# Altium PCB 4Bit_CPU_PCB_TEAM_C4.PcbDoc
Units mil, origin at the board's own origin, x right, y up, seen from the top; angles counter-clockwise.
Board outline 6000 x 4000 mil, 2 copper layers (Top Layer, Bottom Layer); 77 components, 63 nets, 450 pads, 42 vias.
Unrouted connection lines stored in the file: 53.
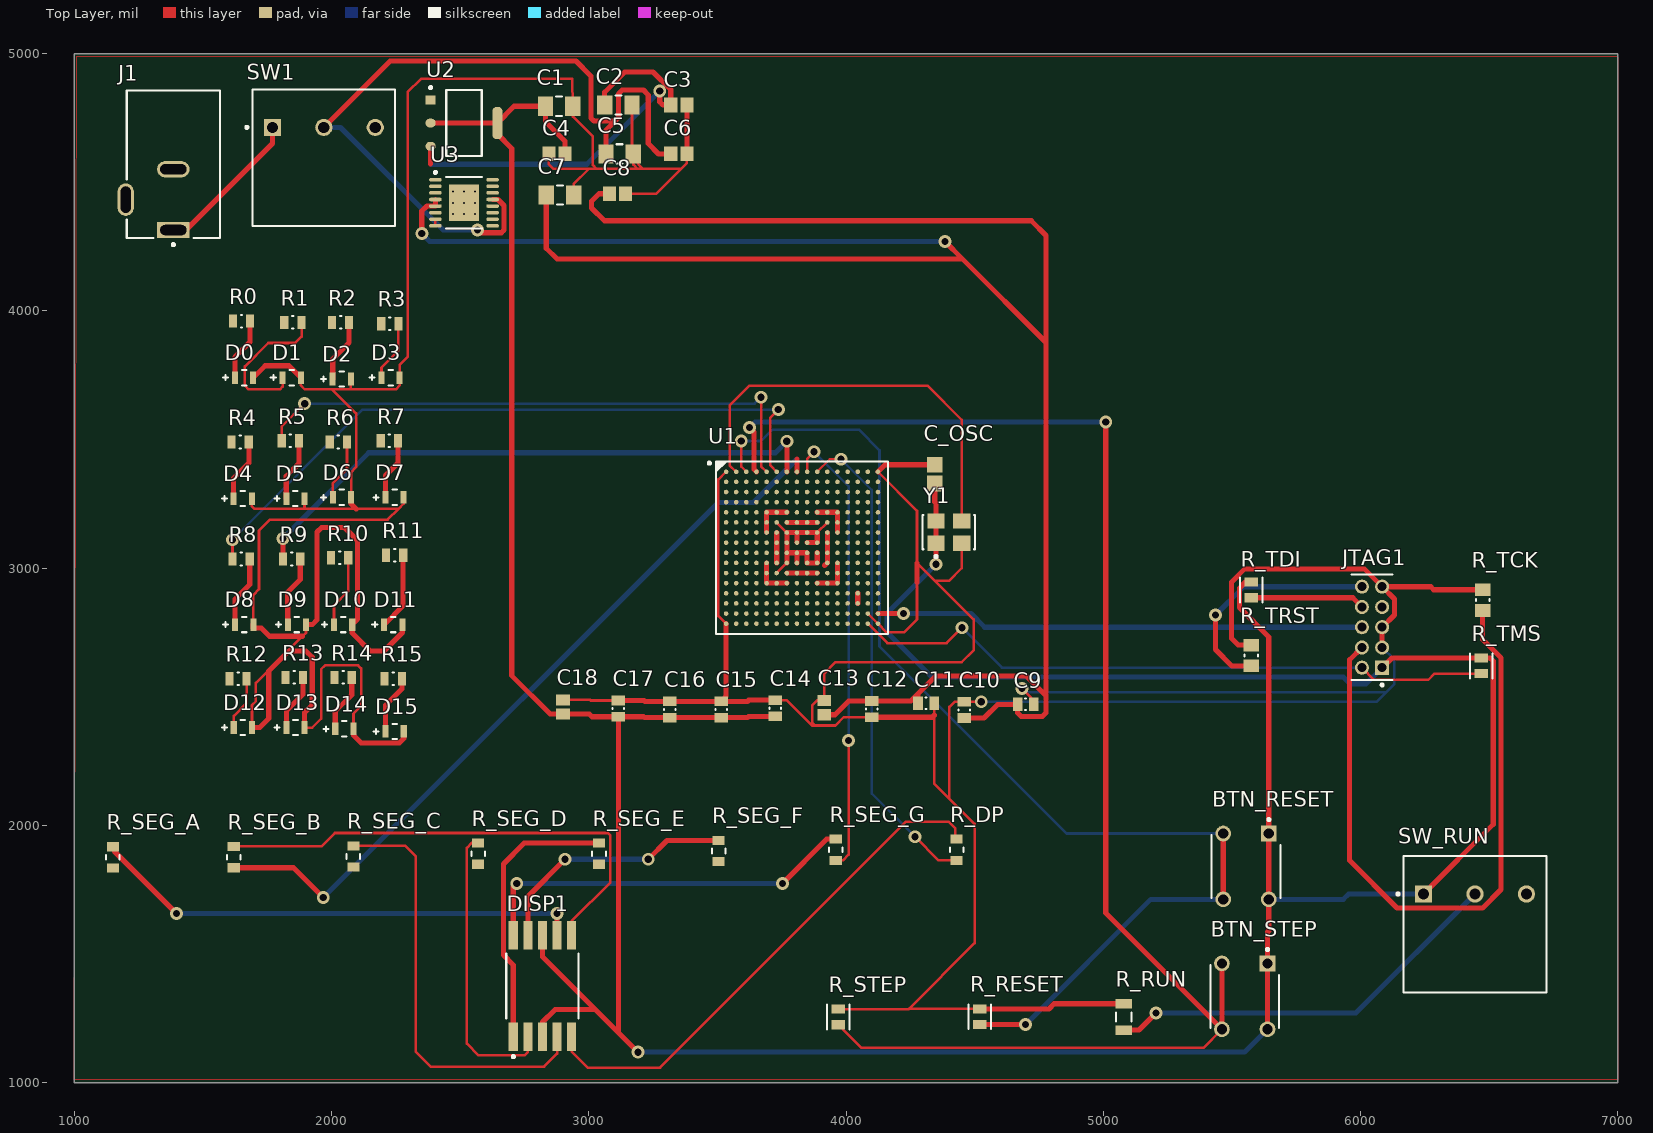
[diagram p0: Top Layer view]
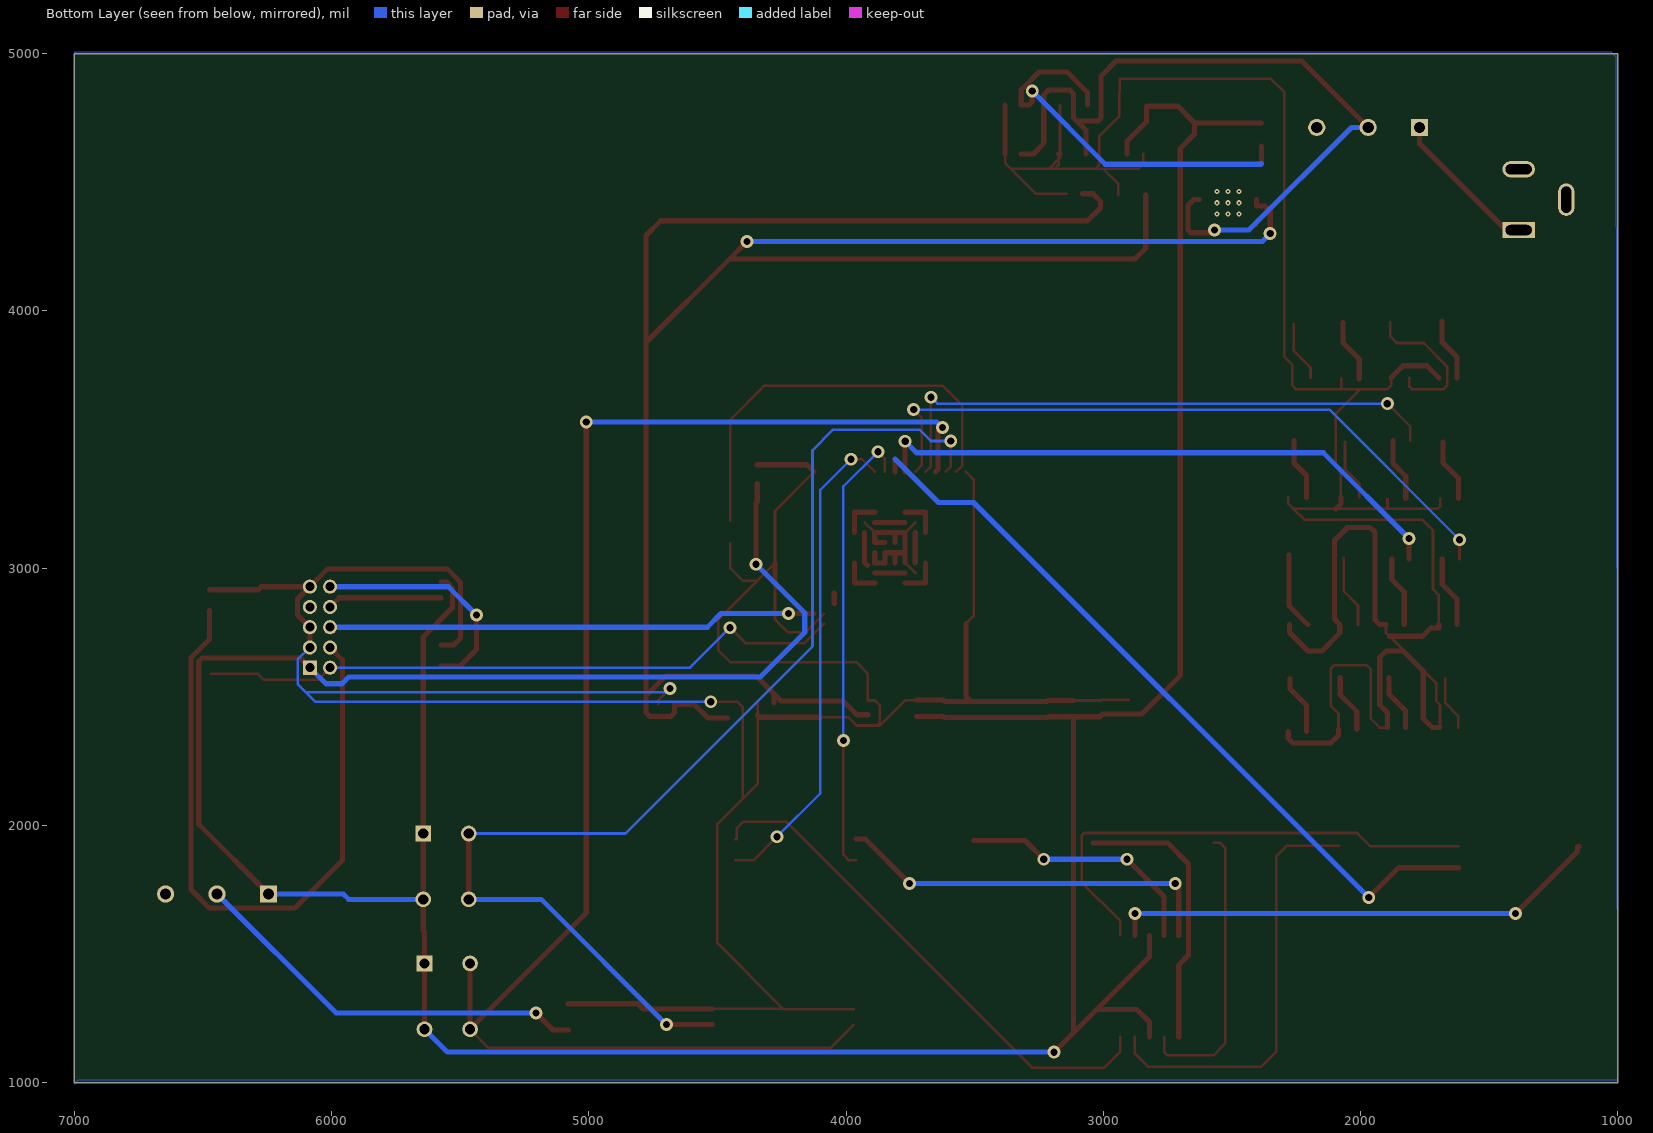
[diagram p1: Bottom Layer view, seen from below]

## Layer stack, top to bottom
Top Solder: solder mask 0.4, Solder Resist, Dk 3.5
Top Layer: signal copper 1.4
Dielectric 1: dielectric 12.6, FR-4, Dk 4.8
Bottom Layer: signal copper 1.4
Bottom Solder: solder mask 0.4, Solder Resist, Dk 3.5

## Board outline
1000,1000 7000,1000 7000,5000 1000,5000

## Design rules (kind name [scope] priority, off if disabled: settings)
Clearance [All] p1: gap=10 ignorepadtopadclearanceinfootprint=FALSE
PolygonConnect [All] p1: connectstyle=Relief reliefconductorwidth=10 reliefentries=4 polygonreliefangle="90 Angle" airgapwidth=10
RoutingVias [All] p1: holewidth=28 width=50 viastyle="Through Hole" minholewidth=28 minwidth=50 maxholewidth=28 maxwidth=50
SolderMaskExpansion [All] p1: expansion=0 istentingtop=FALSE
SupplyNets "Schematic Supply Nets_4" [InNet('+3V3')] p1: voltage=0.000
SupplyNets "Schematic Supply Nets_3" [InNet('GND')] p2: voltage=0.000
SupplyNets "Schematic Supply Nets_2" [InNet('+5V_IN')] p3: voltage=0.000
SupplyNets "Schematic Supply Nets_1" [InNet('+5V_SW')] p4: voltage=0.000
SupplyNets "Schematic Supply Nets" [InNet('+1V5')] p5: voltage=0.000
Width Power_Width [InNet('+5V_IN') OR InNet('+5V_SW') OR InNet('+3V3') OR InNet('+1V5')] p1: maxlimit=40 minlimit=12 preferedwidth=20
Width [All] p2: maxlimit=20 minlimit=8 preferedwidth=10
30 further rules are at their usual default settings.

## Components (designator, comment, footprint, x,y, rotation, side; value= is the part's Value field where it differs from the comment)
BTN_RESET "B3W-1000" FP-B3W-1000-MFG 5555,1840 r90 top
BTN_STEP "B3W-1000" FP-B3W-1000-MFG 5550,1335 r90 top
C1 "10uF" FP-1206-L_3_2_0_3-W_1_6_0-IPC_B 2885,4795 r0 top
C2 "10uF" FP-1206-L_3_2_0_3-W_1_6_0-IPC_B 3115,4800 r0 top
C3 "100nF" CAPC2013X145X50NL20T25 3350,4800 r0 top
C4 "100nF" CAPC2013X145X50NL20T25 2876.5,4610 r0 top
C5 "10uF" FP-1206-L_3_2_0_3-W_1_6_0-IPC_B 3120,4610 r0 top
C6 "100nF" CAPC2013X145X50NL20T25 3350,4610 r0 top
C7 "10uF" FP-1206-L_3_2_0_3-W_1_6_0-IPC_B 2888.17,4450 r0 top
C8 "100nF" CAPC2013X145X50NL20T25 3111.5,4455 r0 top
C9 "100nF" CAPC0805(2012)100_L 4698.5,2470 r0 top
C10 "100nF" CAPC0805(2012)100_L 4460,2448.5 r90 top
C11 "100nF" CAPC0805(2012)100_L 4311.5,2475 r0 top
C12 "100nF" CAPC0805(2012)100_L 4100,2451.5 r90 top
C13 "10uF" CAPC2013X140X50LL20T25 3915,2457.44 r90 top
C14 "100nF" CAPC0805(2012)100_L 3725,2455 r90 top
C15 "100nF" CAPC0805(2012)100_L 3515,2450 r90 top
C16 "100nF" CAPC0805(2012)100_L 3315,2450 r90 top
C17 "100nF" CAPC0805(2012)100_L 3115,2453.5 r90 top
C18 "10uF" CAPC2013X140X50LL20T25 2900,2460 r90 top
C_OSC "10nF" CAPC2013X94X50ML20T25 4345,3365 r90 top
D0 "SML-LX0805SRC-TR" FP-SML-LX0805SRC-TR-MFG 1660,3740 r0 top
D1 "SML-LX0805SRC-TR" FP-SML-LX0805SRC-TR-MFG 1845.43,3740 r0 top
D2 "SML-LX0805SRC-TR" FP-SML-LX0805SRC-TR-MFG 2040,3735 r0 top
D3 "SML-LX0805SRC-TR" FP-SML-LX0805SRC-TR-MFG 2229.57,3740 r0 top
D4 "SML-LX0805SRC-TR" FP-SML-LX0805SRC-TR-MFG 1655,3270 r0 top
D5 "SML-LX0805SRC-TR" FP-SML-LX0805SRC-TR-MFG 1859.57,3270 r0 top
D6 "SML-LX0805SRC-TR" FP-SML-LX0805SRC-TR-MFG 2040.43,3275 r0 top
D7 "SML-LX0805SRC-TR" FP-SML-LX0805SRC-TR-MFG 2245,3275 r0 top
D8 "SML-LX0805SRC-TR" FP-SML-LX0805SRC-TR-MFG 1660.43,2780 r0 top
D9 "SML-LX0805SRC-TR" FP-SML-LX0805SRC-TR-MFG 1865.43,2780 r0 top
D10 "SML-LX0805SRC-TR" FP-SML-LX0805SRC-TR-MFG 2045,2780 r0 top
D11 "SML-LX0805SRC-TR" FP-SML-LX0805SRC-TR-MFG 2240,2780 r0 top
D12 "SML-LX0805SRC-TR" FP-SML-LX0805SRC-TR-MFG 1655.43,2380 r0 top
D13 "SML-LX0805SRC-TR" FP-SML-LX0805SRC-TR-MFG 1860,2380 r0 top
D14 "SML-LX0805SRC-TR" FP-SML-LX0805SRC-TR-MFG 2050,2375 r0 top
D15 "SML-LX0805SRC-TR" FP-SML-LX0805SRC-TR-MFG 2245.43,2365 r0 top
DISP1 "ACSA02-41SURKWA-F01" FP-ACSA02-41SURKWA-F01-MFG 2820,1375 r0 top
J1 "DC Jack 5V Input" FP-PJ-102A-MFG 1385,4570 r0 top
JTAG1 "TMM-105-02-L-D" FP-TMM-105-02-L-D-MFG 6045,2770 r90 top
R0 "330R" FP-CRCW0805-e3-IPC_C 1650,3960 r0 top
R1 "330R" FP-CRCW0805-e3-IPC_C 1850,3955 r0 top
R2 "330R" FP-CRCW0805-e3-IPC_C 2035,3955 r0 top
R3 "330R" FP-CRCW0805-e3-IPC_C 2226.5,3950 r0 top
R4 "330R" FP-CRCW0805-e3-IPC_C 1645,3490 r0 top
R5 "330R" FP-CRCW0805-e3-IPC_C 1840,3495 r0 top
R6 "330R" FP-CRCW0805-e3-IPC_C 2026.5,3490 r0 top
R7 "330R" FP-CRCW0805-e3-IPC_C 2225,3495 r0 top
R8 "330R" FP-CRCW0805-e3-IPC_C 1648.5,3035 r0 top
R9 "330R" FP-CRCW0805-e3-IPC_C 1845,3035 r0 top
R10 "330R" FP-CRCW0805-e3-IPC_C 2031.5,3040 r0 top
R11 "330R" FP-CRCW0805-e3-IPC_C 2245,3050 r0 top
R12 "330R" FP-CRCW0805-e3-IPC_C 1636.5,2570 r0 top
R13 "330R" FP-CRCW0805-e3-IPC_C 1855,2575 r0 top
R14 "330R" FP-CRCW0805-e3-IPC_C 2045,2575 r0 top
R15 "330R" FP-CRCW0805-e3-IPC_C 2240,2570 r0 top
R_DP "330R" FP-RT0805-MFG 4430,1905 r90 top value=330Ω
R_RESET "10k" FP-CRGP0805-IPC_C 4520,1255.55 r90 top value=10KΩ
R_RUN "10k" FP-CRGCQ1206-IPC_C 5080,1255 r90 top value=10KΩ
R_SEG_A "330R" FP-RT0805-MFG 1150,1875 r90 top value=330Ω
R_SEG_B "330R" FP-RT0805-MFG 1620,1876.34 r90 top value=330Ω
R_SEG_C "330R" FP-RT0805-MFG 2085,1878.66 r90 top value=330Ω
R_SEG_D "330R" FP-RT0805-MFG 2570,1890 r90 top value=330Ω
R_SEG_E "330R" FP-RT0805-MFG 3040,1890 r90 top value=330Ω
R_SEG_F "330R" FP-RT0805-MFG 3505,1900 r90 top value=330Ω
R_SEG_G "330R" FP-RT0805-MFG 3960,1905 r90 top value=330Ω
R_STEP "10k" FP-CRGP0805-IPC_C 3970,1255 r90 top value=10KΩ
R_TCK "1k" RESC2013X50X30ML20T20 6475,2875.35 r90 top
R_TDI "10k" FP-CRGP0805-IPC_C 5575,2915 r90 top value=10KΩ
R_TMS "10k" FP-CRGP0805-IPC_C 6470,2620 r90 top value=10KΩ
R_TRST "1k" RESC2013X50X30ML20T20 5575,2660 r90 top
SW1 "25536NA6" FP-25536NA6-0 1970,4595 r0 top
SW_RUN "25536NA6" FP-25536NA6-0 6445,1615 r0 top
U1 "M7A3P600-FG256" FG256 3829.06,3079.06 r0 top
U2 "AMS1117-3.3" FP-AMS1117-IPC_C 2515,4730 r0 top
U3 "1.5V Regulator" LT-FE-16-EPV-BB_L 2515,4420 r0 top
Y1 "ASFL1-100.000MHZ-L-T" FP-ASFL1-MFG 4400,3140 r0 top

## Footprints (in the part's own frame and the unit in brackets; to place one, negate y for a bottom-side part, rotate by r counter-clockwise, add the part's x,y. Pads: shape width x height; smd on the part's side, far side on the other; paste and mask are expansions set on the pad)
CAPC0805(2012)100_L [mm] "Chip Capacitor, Body 2.0x1.2mm, Height 1.0mm, IPC High Density"
  rect 0.95x1.35 smd: 1(-0.8,0) 2(0.8,0)
  silkscreen extent -0.05,-0.58 0.05,0.58, body extent -1.1,-0.72 1.1,0.72, height 1
CAPC2013X94X50ML20T25 [mm] "Chip Capacitor, 2-Leads, Body 2.01x1.25mm, IPC Low Density"
  rect 1.55x1.55 smd: 1(-0.925,0) 2(0.925,0)
  body extent -1.1,-0.72 1.11,0.72, height 0.94
CAPC2013X140X50LL20T25 [mm] "Chip Capacitor, 2-Leads, Body 2.00x1.25mm, IPC High Density"
  rect 1.1x1.35 smd: 1(-0.7,0) 2(0.7,0)
  body extent -1.1,-0.72 1.1,0.72, height 1.4
CAPC2013X145X50NL20T25 [mm] "Chip Capacitor, 2-Leads, Body 2.00x1.25mm, IPC Medium Density"
  rect 1.3x1.45 smd: 1(-0.8,0) 2(0.8,0)
  body extent -1.1,-0.72 1.1,0.72, height 1.45
FG256 [mm] "BGA, 256-Leads, Body 17x17mm, Pitch 1mm"
  round 0.45 smd: A1(-7.5,7.5) A2(-6.5,7.5) A3(-5.5,7.5) A4(-4.5,7.5) A5(-3.5,7.5) A6(-2.5,7.5) A7(-1.5,7.5) A8(-0.5,7.5) A9(0.5,7.5) A10(1.5,7.5) A11(2.5,7.5) A12(3.5,7.5) A13(4.5,7.5) A14(5.5,7.5) A15(6.5,7.5) A16(7.5,7.5) B1(-7.5,6.5) B2(-6.5,6.5) B3(-5.5,6.5) B4(-4.5,6.5) B5(-3.5,6.5) B6(-2.5,6.5) B7(-1.5,6.5) B8(-0.5,6.5) B9(0.5,6.5) B10(1.5,6.5) B11(2.5,6.5) B12(3.5,6.5) B13(4.5,6.5) B14(5.5,6.5) B15(6.5,6.5) B16(7.5,6.5) C1(-7.5,5.5) C2(-6.5,5.5) C3(-5.5,5.5) C4(-4.5,5.5) C5(-3.5,5.5) C6(-2.5,5.5) C7(-1.5,5.5) C8(-0.5,5.5) C9(0.5,5.5) C10(1.5,5.5) C11(2.5,5.5) C12(3.5,5.5) C13(4.5,5.5) C14(5.5,5.5) C15(6.5,5.5) C16(7.5,5.5) D1(-7.5,4.5) D2(-6.5,4.5) D3(-5.5,4.5) D4(-4.5,4.5) D5(-3.5,4.5) D6(-2.5,4.5) D7(-1.5,4.5) D8(-0.5,4.5) D9(0.5,4.5) D10(1.5,4.5) D11(2.5,4.5) D12(3.5,4.5) D13(4.5,4.5) D14(5.5,4.5) D15(6.5,4.5) D16(7.5,4.5) E1(-7.5,3.5) E2(-6.5,3.5) E3(-5.5,3.5) E4(-4.5,3.5) E5(-3.5,3.5) E6(-2.5,3.5) E7(-1.5,3.5) E8(-0.5,3.5) E9(0.5,3.5) E10(1.5,3.5) E11(2.5,3.5) E12(3.5,3.5) E13(4.5,3.5) E14(5.5,3.5) E15(6.5,3.5) E16(7.5,3.5) F1(-7.5,2.5) F2(-6.5,2.5) F3(-5.5,2.5) F4(-4.5,2.5) F5(-3.5,2.5) F6(-2.5,2.5) F7(-1.5,2.5) F8(-0.5,2.5) F9(0.5,2.5) F10(1.5,2.5) F11(2.5,2.5) F12(3.5,2.5) F13(4.5,2.5) F14(5.5,2.5) F15(6.5,2.5) F16(7.5,2.5) G1(-7.5,1.5) G2(-6.5,1.5) G3(-5.5,1.5) G4(-4.5,1.5) G5(-3.5,1.5) G6(-2.5,1.5) G7(-1.5,1.5) G8(-0.5,1.5) G9(0.5,1.5) G10(1.5,1.5) G11(2.5,1.5) G12(3.5,1.5) G13(4.5,1.5) G14(5.5,1.5) G15(6.5,1.5) G16(7.5,1.5) H1(-7.5,0.5) H2(-6.5,0.5) H3(-5.5,0.5) H4(-4.5,0.5) H5(-3.5,0.5) H6(-2.5,0.5) H7(-1.5,0.5) H8(-0.5,0.5) H9(0.5,0.5) H10(1.5,0.5) H11(2.5,0.5) H12(3.5,0.5) H13(4.5,0.5) H14(5.5,0.5) H15(6.5,0.5) H16(7.5,0.5) J1(-7.5,-0.5) J2(-6.5,-0.5) J3(-5.5,-0.5) J4(-4.5,-0.5) J5(-3.5,-0.5) J6(-2.5,-0.5) J7(-1.5,-0.5) J8(-0.5,-0.5) J9(0.5,-0.5) J10(1.5,-0.5) J11(2.5,-0.5) J12(3.5,-0.5) J13(4.5,-0.5) J14(5.5,-0.5) J15(6.5,-0.5) J16(7.5,-0.5) K1(-7.5,-1.5) K2(-6.5,-1.5) K3(-5.5,-1.5) K4(-4.5,-1.5) K5(-3.5,-1.5) K6(-2.5,-1.5) K7(-1.5,-1.5) K8(-0.5,-1.5) K9(0.5,-1.5) K10(1.5,-1.5) K11(2.5,-1.5) K12(3.5,-1.5) K13(4.5,-1.5) K14(5.5,-1.5) K15(6.5,-1.5) K16(7.5,-1.5) L1(-7.5,-2.5) L2(-6.5,-2.5) L3(-5.5,-2.5) L4(-4.5,-2.5) L5(-3.5,-2.5) L6(-2.5,-2.5) L7(-1.5,-2.5) L8(-0.5,-2.5) L9(0.5,-2.5) L10(1.5,-2.5) L11(2.5,-2.5) L12(3.5,-2.5) L13(4.5,-2.5) L14(5.5,-2.5) L15(6.5,-2.5) L16(7.5,-2.5) M1(-7.5,-3.5) M2(-6.5,-3.5) M3(-5.5,-3.5) M4(-4.5,-3.5) M5(-3.5,-3.5) M6(-2.5,-3.5) M7(-1.5,-3.5) M8(-0.5,-3.5) M9(0.5,-3.5) M10(1.5,-3.5) M11(2.5,-3.5) M12(3.5,-3.5) M13(4.5,-3.5) M14(5.5,-3.5) M15(6.5,-3.5) M16(7.5,-3.5) N1(-7.5,-4.5) N2(-6.5,-4.5) N3(-5.5,-4.5) N4(-4.5,-4.5) N5(-3.5,-4.5) N6(-2.5,-4.5) N7(-1.5,-4.5) N8(-0.5,-4.5) N9(0.5,-4.5) N10(1.5,-4.5) N11(2.5,-4.5) N12(3.5,-4.5) N13(4.5,-4.5) N14(5.5,-4.5) N15(6.5,-4.5) N16(7.5,-4.5) P1(-7.5,-5.5) P2(-6.5,-5.5) P3(-5.5,-5.5) P4(-4.5,-5.5) P5(-3.5,-5.5) P6(-2.5,-5.5) P7(-1.5,-5.5) P8(-0.5,-5.5) P9(0.5,-5.5) P10(1.5,-5.5) P11(2.5,-5.5) P12(3.5,-5.5) P13(4.5,-5.5) P14(5.5,-5.5) P15(6.5,-5.5) P16(7.5,-5.5) R1(-7.5,-6.5) R2(-6.5,-6.5) R3(-5.5,-6.5) R4(-4.5,-6.5) R5(-3.5,-6.5) R6(-2.5,-6.5) R7(-1.5,-6.5) R8(-0.5,-6.5) R9(0.5,-6.5) R10(1.5,-6.5) R11(2.5,-6.5) R12(3.5,-6.5) R13(4.5,-6.5) R14(5.5,-6.5) R15(6.5,-6.5) R16(7.5,-6.5) T1(-7.5,-7.5) T2(-6.5,-7.5) T3(-5.5,-7.5) T4(-4.5,-7.5) T5(-3.5,-7.5) T6(-2.5,-7.5) T7(-1.5,-7.5) T8(-0.5,-7.5) T9(0.5,-7.5) T10(1.5,-7.5) T11(2.5,-7.5) T12(3.5,-7.5) T13(4.5,-7.5) T14(5.5,-7.5) T15(6.5,-7.5) T16(7.5,-7.5)
  silkscreen extent -9.27,-8.5 8.5,8.5, body extent -8.5,-8.5 8.5,8.5, height 1.97
FP-1206-L_3_2_0_3-W_1_6_0-IPC_B [mil]
  rect 59.18x74.97 smd paste+0 mask+0: 1(-53.17,0) 2(53.17,0)
  silkscreen extent -12,-37 12,37, body extent -93,-47 93,47, height 10
FP-25536NA6-0 [mm]
  rect 1.7x1.7 hole 1.1 paste-2539.97 mask+0: 1(-5.08,3)
  round 1.7 hole 1.1 paste-2539.97 mask+0: 2(0,3) 3(5.08,3)
  silkscreen extent -7.72,-6.75 7.05,6.75, body extent -7.15,-6.85 7.15,6.85, height 0.25
FP-ACSA02-41SURKWA-F01-MFG [mm]
  rect 0.9x2.8 smd paste+0 mask+0: 1(-2.88,-5) 2(-1.44,-5) 3(0,-5) 4(1.44,-5) 5(2.88,-5) 6(2.88,5) 7(1.44,5) 8(0,5) 9(-1.44,5) 10(-2.88,5)
  silkscreen extent -3.57,-7.1 3.57,3.22, body extent -3.67,-6.5 3.67,6.5, height 0.25
FP-AMS1117-IPC_C [mm]
  rect 1.004x0.872 smd paste+0 mask+0: 1(-3.295,2.29)
  rrect100% 1.004x0.872 smd paste+0 mask+0: 2(-3.295,0) 3(-3.295,-2.29)
  rrect87% 1.004x3.182 smd paste+0 mask+0: 4(3.295,0)
  silkscreen extent -3.42,-3.25 1.75,3.62, body extent -3.9,-3.35 3.9,3.35, height 0.25
FP-ASFL1-MFG [mm]
  rect 1.7x1.5 smd paste+0 mask+0: 1(-1.27,-1.1) 2(1.27,-1.1) 3(1.27,1.1) 4(-1.27,1.1)
  silkscreen extent -2.6,-2.54 2.6,1.7, body extent -2.7,-1.95 2.7,1.95, height 0.25
FP-B3W-1000-MFG [mm]
  rect 1.55x1.55 hole 1 paste-2539.97 mask+0: 1(3.25,-2.25)
  round 1.55 hole 1 paste-2539.97 mask+0: 2(-3.25,-2.25) 3(3.25,2.25) 4(-3.25,2.25)
  silkscreen extent -3.1,-3.4 4.75,3.4, body extent -4.13,-3.5 4.13,3.5, height 0.25
FP-CRCW0805-e3-IPC_C [mil]
  rect 31.75x51.5 smd paste+0 mask+0: 1(-33.5,0) 2(33.5,0)
  silkscreen extent -3,-25 3,25, body extent -53,-31 53,31, height 10
FP-CRGCQ1206-IPC_C [mil]
  rect 37.64x63.38 smd paste+0 mask+0: 1(-51.22,0) 2(51.22,0)
  silkscreen extent -18,-31 18,31, body extent -74,-37 74,37, height 10
FP-CRGP0805-IPC_C [mil]
  rect 35.67x51.57 smd paste+0 mask+0: 1(-30.55,0) 2(30.55,0)
  silkscreen extent -48,-43 48,43, body extent -52,-31 52,31, height 10
FP-PJ-102A-MFG [mm]
  rect 3.2x1.6 hole 1 slot 2.6 at 0 deg paste-2539.97 mask+0: 1(0,-6.5)
  rrect100% 3.2x1.6 hole 1 slot 2.6 at 0 deg paste-2539.97 mask+0: 2(0,-0.5)
  rrect100% 1.6x3.2 hole 2.6 slot 1 at 0 deg paste-2539.97 mask+0: 3(-4.7,-3.5)
  silkscreen extent -4.6,-8.07 4.6,7.3, body extent -5.6,-7.4 4.7,7.4, height 0.25
FP-RT0805-MFG [mm]
  rect 0.9x1.2 smd paste+0 mask+0: 1(-1.05,0) 2(1.05,0)
  silkscreen extent -0.22,-0.67 0.22,0.67, body extent -1.6,-0.77 1.6,0.77, height 0.25
FP-SML-LX0805SRC-TR-MFG [mm]
  rect 0.6x1.25 smd paste+0 mask+0: 1(-0.9,0) 2(0.9,0)
  silkscreen extent -2.07,-0.75 0.22,0.75, body extent -1.3,-0.85 1.3,0.85, height 0.25
FP-TMM-105-02-L-D-MFG [mm]
  rect 1.39x1.39 hole 0.89 paste-2539.97 mask+0: 1(-4,-1)
  round 1.39 hole 0.89 paste-2539.97 mask+0: 2(-4,1) 3(-2,-1) 4(-2,1) 5(0,-1) 6(0,1) 7(2,-1) 8(2,1) 9(4,-1) 10(4,1)
  silkscreen extent -5.82,-2.03 5.22,2.03
LT-FE-16-EPV-BB_L [mm] "SOP, 16-Leads, Body 5.1x4.5mm, Pitch 0.65mm, Thermal Pad 3.58x2.94mm, IPC High Density"
  oval 1.25x0.35 smd: 1(-2.825,2.275) 2(-2.825,1.625) 3(-2.825,0.975) 4(-2.825,0.325) 5(-2.825,-0.325) 6(-2.825,-0.975) 7(-2.825,-1.625) 8(-2.825,-2.275) 9(2.825,-2.275) 10(2.825,-1.625) 11(2.825,-0.975) 12(2.825,-0.325) 13(2.825,0.325) 14(2.825,0.975) 15(2.825,1.625) 16(2.825,2.275)
  rect 2.94x3.58 smd: 17(0,0)
  silkscreen extent -2.95,-2.55 1.8,3.12, body extent -2.25,-2.55 2.25,2.55, height 1.1
RESC2013X50X30ML20T20 [mm] "Chip Resistor, 2-Leads, Body 2.00x1.25mm, IPC Low Density"
  rect 1.25x1.55 smd: 1(-1.025,0) 2(1.025,0)
  silkscreen extent -0.1,-0.67 0.1,0.67, body extent -1.1,-0.72 1.1,0.72, height 0.5

## Part data
BTN_RESET BTN_STEP: library part CMP-08834-000045-1, "SWITCH TACTILE SPST-NO 0.05A 24V", Actuator Color=White, Contact Current Rating=50mA, Contact Resistance=100mR, Insulation Resistance=100MR, Max Operating Temperature=70°C, Max Voltage Rating (DC)=24V, Min Operating Temperature=-25°C, Operating Force=1.57N, Package Quantity=100, Ratings=IP67, Actuator Length=0.9mm, Actuator Type=Standard, Contact Material=Silver, Contact Plating=Silver, Current Rating=50mA, Depth=6.6mm, Illumination Type=Non-Illuminated, Length=6.6mm, Max Current Rating=50mA, Mechanical Life=1000000Cycles, Mount="Through Hole", Number of Poles=1, Orientation=Straight, Packaging=Bulk, Radiation Hardening=No, RoHS Compliant=Yes, Series=B3W, Switch Function=Off-Mom, Switch Travel=0.25mm, Termination="PC Pins", Throw Configuration=SPST, Voltage Rating (DC)=24V, Weight=0.3g
C1 C2 C5 C7: library part CMP-2000-07359-3, "None", Case Code (Imperial)=1206, Case Code (Metric)=3216, Dielectric=X5R, Max Operating Temperature=85°C, Min Operating Temperature=-55°C, Package Quantity=2000, Tolerance=20%, Voltage Rating=50V, Capacitance=10uF, Case/Package=1206, Construction=Flat, Halogen Free="Halogen Free", Height=1.6mm, Length=0.126inch, Mount="Surface Mount", Packaging="Tape and Reel", RoHS Compliant=Yes, Series=M, Termination=SMD/SMT, Thickness=0.075inch, Voltage Rating (DC)=50V, Width=0.063inch
C3 C4 C6 C8: library part CMP-2007-01227-1, Manufacturer=Kemet, Part Number=C0805S104K5RACTU
C9 C10 C11 C12 C14 C15 C16 C17: library part CMP-1036-04418-1, "CAP 100nF 50V ±5% 0805 (2012 Metric) Thickness 1mm SMD", Case-EIA=0805, Case-Metric=2012, Rated Voltage="50 V", Tolerance=Â±5%, Max Thickness="1 mm", Technology=SMT
C13 C18: library part CMP-1036-04929-2, Manufacturer="AVX Interconnect / Elco", Part Number=0805YD106MAT2A
C_OSC: library part CMP-2007-04168-1, Manufacturer="AVX Interconnect / Elco", Part Number=08051C103KAT4A
D0 D1 D2 D3 D4 D5 D6 D7 D8 D9 D10 D11 D12 D13 D14 D15: library part CMP-57192-000013-1, "LED RED CLEAR SMD", Case Code (Imperial)=0805, Case Code (Metric)=2012, Color=Red, Current Rating=25mA, Forward Current=20mA, Forward Voltage=1.7V, Lens Color=Colorless, Max Operating Temperature=85°C, Min Operating Temperature=-40°C, Package Quantity=3000, Power Rating=100mW, Approvals=UL, Case/Package=0805, Dominant Wavelength=660nm, Height=1.2mm, Illumination Color=Red, Lead Free="Lead Free", Length=2mm, Lens Style=Clear, Lens Transparency=Clear, Luminous Intensity=25mcd, Mount="Surface Mount", Number of LEDs=1, Number of Pins=2, Packaging="Tape and Reel", RoHS Compliant=Yes, Series=-, Test Current=20mA, Viewing Angle=140°, Voltage Rating=1.7V, Voltage Rating (DC)=1.7V, Wavelength=660nm, Width=1.25mm
DISP1: library part CMP-44525-000003-1, "DISPLAY 7-SEG 0.2\" SGL RED 10SMD", Case/Package=SMD/SMT, Color=Red, Forward Current=30mA, Forward Voltage=1.95V, Max Operating Temperature=85°C, Max Power Dissipation=75mW, Min Operating Temperature=-40°C, Package Quantity=650, Test Current=20mA, Element Configuration="Common Anode", Height=0.315inch, Illumination Color=Red, Luminous Intensity=30mcd, Number of Characters=1, Operating Supply Voltage=1.95V, Packaging="Tape and Reel", Power Consumption=75mW, Wavelength=630nm, Width=0.272inch
J1: library part CMP-12637-106234071-1, "PJ-102A 2.0 x 6.5 mm, 2.5 A, Horizontal, Through Hole, Tapered Pins, Dc Power Jack Connector", Color=Black, Current Rating=2.5A, Flammability Rating="UL94 V-0", Insulation Resistance=50MΩ, Max Operating Temperature=85°C, Min Operating Temperature=-25°C, Voltage Rating=24V, Contact Gender=Male, Contact Material="Copper, Nickel, Tin", Contact Plating=Nickel, Diameter=2.1mm, Gender=Male, Height=11.2mm, Housing Color=Black, Housing Material=Thermoplastic, Inside Diameter=2mm, Lead Free="Lead Free", Lifecycle Status=Production, Mount="Through Hole", NexarPartId=106234071, Number of Conductors=2, Number of Contacts=3, Orientation=Horizontal, Outside Diameter=6.5mm, Packaging=Bulk, RoHS=Compliant, Schedule B="8536695050, 8536695050", Shielding=No, Termination="Through Hole", Voltage Rating (DC)=24V
JTAG1: library part CMP-02766-001571-1, "CONN HEADER VERT 10POS 2MM", Housing Color=Black, Max Current Rating=3.9A, Max Operating Temperature=125°C, Max Voltage Rating (AC)=500V, Min Operating Temperature=-55°C, Connector Type=Header, Contact Finish - Mating=GOLD, Contact Material=Bronze, Contact Plating=Gold, Contact Shape=Square, Contact Type="Male Pin", Depth=3.94mm, Fastening Type=Pull, Gender=Male, Housing Material=Polymer, Insulation Color=Black, Insulation Material=Polymer, Lead Free="Lead Free", Length=10mm, Number of Contacts=10, Number of Positions=10, Number of Rows=2, Orientation=Straight, Packaging=Bulk, Pitch=2mm, Radiation Hardening=No, REACH SVHC="No SVHC", RoHS Compliant=Yes, Series=TMM, Termination=Solder
R0 R1 R2 R3 R4 R5 R6 R7 R8 R9 R10 R11 R12 R13 R14 R15: library part CMP-2001-03824-2, "RES Thick Film, 330Ω, 5%, 0.125W, 200ppm/°C, 0805", Case Code (Imperial)=0805, Case Code (Metric)=2012, Max Operating Temperature=155°C, Max Power Dissipation=125mW, Min Operating Temperature=-55°C, Package Quantity=1, Temperature Coefficient=200ppm/°C, Tolerance=5%, Voltage Rating=150V, Case/Package=0805, Composition="Thick Film", Contact Plating=Tin, Depth=1.25mm, Features="Automotive AEC-Q200", Height=0.02inch, Lead Free="Lead Free", Length=2mm, Military Standard=Not, Number of Terminations=2, Packaging="Tape and Reel", Power Rating=125mW, Radiation Hardening=No, Resistance=330R, Termination=SMD/SMT, Voltage Rating (DC)=150V, Weight=0.000194oz, Width=0.049inch
R_DP R_SEG_A R_SEG_B R_SEG_C R_SEG_D R_SEG_E R_SEG_F R_SEG_G: library part CMP-2001-01631-2, "RES 330 OHM 1/8W .1% SMD 0805", Manufacturer=Yageo, Manufacturer Part Number=RT0805BRD07330RL, Package=RT0805, Power Rating=0.125W, Resistance=330Ω, Temperature="-55°C to +155°C", Temperature Coefficient="25 ppm/°C", Temperature Range High=+155°C, Temperature Range Low=-55°C, Tolerance=0.0025, Voltage Rating=150V, Automotive=No, Category=Res, ComponentLink2Description=Datasheet, ComponentLink2URL=http://www.yageo.com/documents/recent/PYu-RT_1-to-0.01_RoHS_L_9.pdf, Composition="Thin Film", Device Class L1="Passive Components", Device Class L2=Resistors, Device Class L3="Chip SMD Resistors", Digikey Description="RES 330 OHM 1/8W .1% SMD 0805", Footprint Url=http://www.yageo.com/exep/pages/download/literatures/PYu-R_Mount_10.pdf, Height=0.6mm, Ipc Land Pattern Name=RESC200125X50, Lead Free=Yes, Mouser Description="Thin Film Resistors - SMD 1/8W 330 ohm .1% 25ppm", Octopart=https://octopart.com/rt0805brd07330rl-yageo-1374790, RoHS=TRUE, Series=RT
R_RESET R_TDI R_TMS: library part CMP-03211-006861-1, "CRGP 0805 10K 1%", Ambient Temperature Range High=+70°C, Manufacturer=TE, Manufacturer Part Number=CRGP0805F10K, Package=CRGP0805, Power Rating=0.33W, Resistance=10KΩ, Temperature="-55°C to +155°C", Temperature Coefficient=±100ppm/°C, Temperature Range High=+155°C, Temperature Range Low=-55°C, Tolerance=0.01, Voltage Rating=150V, Automotive=No, Category=Res, ComponentLink2Description=Datasheet, ComponentLink2URL=https://www.mouser.com/datasheet/2/418/NG_DS_9-1773463-9_A-1358566.pdf, Composition="Thick Film", Device Class L1="Passive Components", Device Class L2=Resistors, Device Class L3="Chip SMD Resistors", Digikey Description="CRGP 0805 10K 1%", Height=0.65mm, Ipc Land Pattern Name=RESC200125X55, Lead Free=Yes, Octopart=https://octopart.com/crgp0805f10k-te+connectivity-91018782, RoHS=TRUE, Series=CRGP
R_RUN: library part CMP-03211-010884-1, "CRGCQ1206 10KΩ 0.25W 1% ±100ppm/°C 200V", Ambient Temperature Range High=+70°C, Manufacturer="TE Connectivity", Manufacturer Part Number=CRGCQ1206F10K, Package=CRGCQ1206, Power Rating=0.25W, Resistance=10KΩ, Temperature="-55°C to +155°C", Temperature Coefficient=±100ppm/°C, Temperature Range High=+155°C, Temperature Range Low=-55°C, Tolerance=0.01, Voltage Rating=200V, Automotive=Yes, Automotive Grade="Grade 913", Category=Res, ComponentLink2Description=Datasheet, ComponentLink2URL=https://www.te.com/commerce/DocumentDelivery/DDEController?Action=showdoc&DocId=Data+Sheet%7F1773204-3%7F1%7Fpdf%7FEnglish%7FENG_DS_1773204-3_1.pdf%7F4-2176347-922, Composition="Thick Film", Device Class L1="Passive Components", Device Class L2=Resistors, Device Class L3="Chip SMD Resistors", Height=0.65mm, Ipc Land Pattern Name=RESC310155X55, Lead Free=Yes, Octopart=https://octopart.com/crgcq1206f10k-te+connectivity-91018244, RoHS=TRUE, Series=CRGCQ
R_STEP: library part CMP-03211-006861-1, Ambient Temperature Range High=+70°C, Manufacturer=TE, Manufacturer Part Number=CRGP0805F10K, Package=CRGP0805, Power Rating=0.33W, Resistance=10KΩ, Temperature="-55°C to +155°C", Temperature Coefficient=±100ppm/°C, Temperature Range High=+155°C, Temperature Range Low=-55°C, Tolerance=0.01, Voltage Rating=150V, Automotive=No, Category=Res, ComponentLink2Description=Datasheet, ComponentLink2URL=https://www.mouser.com/datasheet/2/418/NG_DS_9-1773463-9_A-1358566.pdf, Composition="Thick Film", Device Class L1="Passive Components", Device Class L2=Resistors, Device Class L3="Chip SMD Resistors", Digikey Description="CRGP 0805 10K 1%", Height=0.65mm, Ipc Land Pattern Name=RESC200125X55, Lead Free=Yes, Octopart=https://octopart.com/crgp0805f10k-te+connectivity-91018782, RoHS=TRUE, Series=CRGP
R_TCK R_TRST: library part CMP-2001-04268-1, Manufacturer="Vishay Dale", Part Number=CRCW08051K00FKTC
SW1 SW_RUN: library part CMP-47022-000007-1, "SWITCH SLIDE SPDT 4A 125V", Contact Current Rating=4A, Contact Resistance=10mR, Current Rating=1A, Max Operating Temperature=85°C, Max Voltage Rating (AC)=250V, Max Voltage Rating (DC)=30V, Min Operating Temperature=-40°C, Package Quantity=100, Voltage Rating (AC)=125V, Actuator Length=6mm, Actuator Material=Nylon, Actuator Type=Standard, Contact Material=Silver, Contact Plating=Silver, Electrical Life=10000Cycles, Illumination Type=Non-Illuminated, Mechanical Life=20000Cycles, Mount="Through Hole", Orientation="Right Angle", Packaging=Bulk, Series=25000N, Switch Function=On-On, Switch Travel=4mm, Termination="PC Pin", Throw Configuration=SPDT, Voltage Rating (DC)=30V
U1: library part CMP-0097-00122-1, "M7-Ready ProASIC3 Flash Family FPGA, 177 User IOs, 600K System Gates, 108 Kbits RAM, 1 Kbit Flash ROM, 1 PLL, 256-Ball FBGA, Commercial Grade", Code_JEDEC=MO-192-DAF-1, ComponentAvailability="F speed grade removed in ver1.3, Oct-2009 datasheet.", DatasheetVersion="v1.1, Feb-2009", PackageDescription="256-Ball Fine Pitch Plastic Ball Grid Array 1.00 mm Pitch (FG256)", PackageReference=FG256, PackageVersion="ver11.2, Nov-2009"
U2: library part CMP-209535-000001-1, "LDO Voltage Regulators 1A, 3.3V", Dropout Voltage=1.1V, Manufacturer="Advanced Monolithic Systems", Max Junction Temp=+125°C, Max Power Dissipation=1.2W, Max Supply Voltage=15V, Nominal Supply Current=5mA, Output Current=1A, Output Voltage=3.3V, Package=AMS1117, Temperature="-40°C to +125°C", Temperature Range Low=-40°C, Automotive=No, Category=IC, ComponentLink2Description=Datasheet, ComponentLink2URL=http://www.advanced-monolithic.com/pdf/ds1117.pdf, Device Class L1="Integrated Circuits (ICs)", Device Class L2="Power Management ICs", Device Class L3="Voltage Regulators - Linear", Height=1.8mm, Ipc Land Pattern Name=SOT229P700X180-4, Lead Free=Yes, Manufacturer Part Number=AMS1117-3.3, Number Of Outputs=1, Octopart=https://octopart.com/ams1117-3.3-advanced+monolithic+systems-25899300, Output Type=Fixed, RoHS=TRUE, Standoff Height=0.64mm, Temperature Range High=+125°C
U3: library part CMP-0476-00499-1, "3 A, Fast Transient Response, Low Noise, LDO Regulator, 2.7 to 20 V Vin, 1.5 V Vout, 16-pin SOP (FE-16-EPV-BB), -40 to 125 degC, Pb-Free, Tape and Reel", Dropout Voltage(V)=0.34, Manufacturer="Linear Technology", Output Voltage="1.5 V", PartNumber=LT1764AEFE-1.5#TRPBF, Shutdown Current(uA)=0.01, ComponentLink1Description="Manufacturer URL", ComponentLink1URL=http://www.linear.com/, ComponentLink2Description=Datasheet, ComponentLink2URL=http://cds.linear.com/docs/en/datasheet/1764afb.pdf, ComponentLink3Description="Package Specification", ComponentLink3URL=http://cds.linear.com/docs/en/packaging/05081663__J_FE16(BB).pdf, DatasheetVersion="Rev. B", Discrete Pass Element=no, Iout(mA)=3000, Isupply(mA)=1, Mounting Technology="Surface Mount", Noise(uV)=40, Number Of Outputs=1, PackageDescription="16-Pin Plastic TSSOP, Body 5 x 4.4 mm, Pitch 0.65 mm", PackageReference=FE-16, PackageVersion="Rev. J, 11/2012", Packing="Tape and Reel", PSRR(dB)=63, RoHS=TRUE, Vin Max(V)=20, Vin Min(V)=2.7
Y1: library part CMP-27762-001808-1, "XTAL Oscillator 100MHz ±100ppm HCMOS, TTL 3.3V 4-SMD 5mm x 3.2mm", Case/Package=SMD/SMT, Frequency=100MHz, Frequency Stability=100ppm, Load Capacitance=15pF, Max Operating Temperature=85°C, Max Supply Current=85mA, Min Operating Temperature=-40°C, Operating Supply Voltage=3.3V, Depth=3.2mm, Height=0.051inch, Length=0.197inch, Mount="Surface Mount", Number of Pins=4, Packaging="Tape and Reel", Radiation Hardening=No, Series=ASFL1, Termination=SMD/SMT, Width=0.126inch

## Via types
v1: diameter 50, hole 28, Top Layer to Bottom Layer, 33 vias
v2: diameter 19.68, hole 7.87, Top Layer to Bottom Layer, 9 vias

## Nets (pads, with @x,y where several pads share a name; then routed paths per layer and width w, separated by ;. In a path a pad name is that pad's centre, name@x,y a point inside that pad or via, vN(x,y) a via of type N, cw(c..) or ccw(c..) an arc to the next point about the centre after c; other vN are vias at no path point)
+1V5: C7.1 C8.1 C9.1 C10.1 C11.1 C12.2 C13.1 U1.F7 U1.F8 U1.F9 U1.F10 U1.G6 U1.G11 U1.H6 U1.H11 U1.J3 U1.J6 U1.J11 U1.K6 U1.K11 U1.L7 U1.L8 U1.L9 U1.L10 U3.3 U3.4 U3.5 U3.6 | length 10253.5
  Top Layer w20: v1(2351,4300) 2351,4387.5 2370.7,4407.2 U3.5 U3.4 ; C7.1 2835,4243 2876,4202 4452,4202 ; C8.1 3040,4455 3011,4426 3011,4400 3061,4350 4720,4350 4777.28,4292.72 4777.28,3876.72 ; U1.K6 U1.J6 U1.H6 U1.G6 ; U1.L7 U1.L8 U1.L9 U1.L10 ; U1.F7 U1.F8 U1.F9 U1.F10 ; C13.1 3957.6,2429.88 4010.71,2482.99 C12.2 4251.99,2482.99 4280,2511 ; 3916.97,3009.49 U1.K11 U1.J11 U1.H11 U1.G11 ; C11.1 4280,2511 ; v1(4385,4269) 4452,4202 ; C10.1 4537,2417.01 4589.99,2470 C9.1 4667.01,2437.5 4681.51,2423 4762.78,2423 4777.28,2437.5 4777.28,2503.72 ; 4280,2511 4350,2581 4700,2581 4777.28,2503.72 ; 4452,4202 4777.28,3876.72 ; 4777.28,2503.72 4777.28,3876.72
  Bottom Layer w20: v1(2351,4300) 2382,4269 v1(4385,4269)
+3V3: BTN_RESET.1 BTN_RESET.2 BTN_STEP.1 BTN_STEP.2 C1.1 C4.2 C14.1 C15.1 C16.1 C17.1 C18.1 C_OSC.1 DISP1.3 DISP1.8 JTAG1.1 R_TDI.2 R_TMS.2 SW_RUN.1 U1.C3 U1.C14 U1.E5 U1.E6 U1.E7 U1.E10 U1.E11 U1.E12 U1.F5 U1.F12 U1.G5 U1.G12 U1.K5 U1.K12 U1.L5 U1.L12 U1.M5 U1.M6 U1.M7 U1.M10 U1.M11 U1.M12 U1.N14 U1.P3 U1.P12 U1.P14 U2.2 U2.4 Y1.1 Y1.4 | length 15818.9
  Top Layer w20: U2.2 U2.4 ; DISP1.3 2820,1235 2868.27,1283.27 3025.73,1283.27 ; DISP1.8 2820,1489 3025.73,1283.27 ; C4.2 2907.99,4659 2831.83,4735.16 C1.1 2709.72,4795 U2.4 ; v1(3191,1118) 3115,1194 ; U1.K5 U1.L5 U1.M5 U1.M6 U1.M7 ; U1.G5 U1.F5 U1.E5 U1.E6 U1.E7 ; C14.1 3622,2423.5 3617,2418.5 C15.1 C16.1 3216.5,2418.5 3213,2422.01 C17.1 ; U1.M10 U1.M11 U1.M12 U1.L12 U1.K12 ; U1.E10 U1.E11 U1.E12 U1.F12 U1.G12 ; U1.P14 U1.N14 ; C_OSC.1 4345,3258 4350,3253 Y1.4 Y1.1 v1(4350,3015) ; R_TDI.2 5553,2945.55 5529.22,2921.77 5529.22,2846.61 5643.58,2732.24 BTN_RESET.1 BTN_RESET.2 5643.58,1590 5638.58,1585 BTN_STEP.1 BTN_STEP.2 ; JTAG1.1 6122.4,2650.55 R_TMS.2 6502.95,2650.55 6516,2637.5 6516,2004.11 SW_RUN.1 ; U2.4 2644.72,4687 2700.83,4630.9 2700.83,2581.61 2850,2432.44 C18.1 3002,2432.44 3012.43,2422.01 C17.1 ; 3025.73,1283.27 3115,1194 ; 3115,1194 C17.1
  Bottom Layer w20: v1(3191,1118) 5549.53,1118 BTN_STEP.2 ; v1(4350,3015) 4160.15,2825.15 4160.15,2750 4333.15,2577 5932.85,2577 5959.85,2550 6021.85,2550 JTAG1.1 ; BTN_RESET.2 5933,1712.05 5954.06,1733.11 SW_RUN.1
+5V_IN: J1.1 SW1.1 | length 587.2
  Top Layer w20: J1.1 1434.09,4314.09 1770,4650 SW1.1
+5V_SW: C5.1 C6.1 SW1.2 U3.10 U3.12 U3.13 U3.14 | length 3132.1
  Top Layer w20: SW1.2 2227.89,4971 2950,4971 3008,4913 3008,4750 3020,4738 3102.8,4738 ; v1(2567,4314) 2571.54,4314 2582,4303.54 2660,4303.54 2670.83,4314.37 2670.83,4408.97 2647,4432.8 U3.13 ; C5.1 3066.83,4702.03 3102.8,4738 ; C6.1 3271,4610 3231,4650 3231,4839.5 3212.5,4858 3130,4858 3115,4843 3115,4750.2 3102.8,4738
  Bottom Layer w20: SW1.2 2034.89,4713.11 2434,4314 v1(2567,4314)
DP: R_DP.1 U1.A10 | length 1899.4
  Top Layer w10: U1.A10 3936.78,3423 v1(3981.11,3423) ; v1(4268,1955.66) 4360,1863.66 R_DP.1
  Bottom Layer w10: v1(3981.11,3423) 4100.15,3303.96 4100.15,2123.51 v1(4268,1955.66)
GND: C1.2 C2.2 C3.2 C4.1 C5.2 C6.2 C7.2 C8.2 C9.2 C10.2 C11.2 C12.1 C13.2 C14.2 C15.2 C16.2 C17.2 C18.2 C_OSC.2 D0.2 D1.2 D2.2 D3.2 D4.2 D5.2 D6.2 D7.2 D8.2 D9.2 D10.2 D11.2 D12.2 D13.2 D14.2 D15.2 J1.2 JTAG1.3 JTAG1.5 JTAG1.9 R_RESET.2 R_RUN.2 R_STEP.2 R_TCK.2 R_TRST.2 U1.A1 U1.A16 U1.B3 U1.D5 U1.D12 U1.F6 U1.F11 U1.G7 U1.G8 U1.G9 U1.G10 U1.H4 U1.H7 U1.H8 U1.H9 U1.H10 U1.J7 U1.J8 U1.J9 U1.J10 U1.K7 U1.K8 U1.K9 U1.K10 U1.L6 U1.L11 U1.N5 U1.N12 U1.R15 U1.T1 U1.T16 U2.1 U3.1 U3.7 U3.8 U3.9 U3.16 U3.17 Y1.2 | length 23965.8
  Top Layer w8: U1.R15 U1.T16
  Top Layer w10: D4.2 1690.43,3239.57 1700,3230 1895,3230 ; D12.2 1690.87,2467 1706,2482.13 1706,2553.5 1887.5,2735 1900.87,2748.37 D9.2 ; D8.2 1695.87,2896 1718,2918.13 1718,3146 1760,3188 2218.43,3188 2260.43,3230 ; D1.2 1880.87,3710 1895.87,3695 2002.43,3695 ; D5.2 1895,3230 ; D13.2 1925,2380 1960,2415 1960,2607 1975,2622 2103,2622 2115,2610 2115,2463.57 2085.43,2434 D14.2 ; D2.2 2075.43,3695 ; D6.2 2075.87,3371.87 2096,3392 2096,3601.43 2002.43,3695 ; D7.2 2280.43,3250 2260.43,3230 ; U3.8 U3.7 ; C4.1 2845,4569.5 2862.5,4552 3000,4552 ; C18.2 3005.44,2487.56 3008,2485 C17.2 ; C7.2 2941.33,4493.33 3000,4552 ; C8.2 3261.5,4455 3358.5,4552 ; C2.2 3168.17,4610.17 3168.17,4610 3168.17,4594.35 C5.2@3173.17,4589.35 ; C5.2 C5.2@3173.17,4589.35 ; C6.2 3381.5,4575 3358.5,4552 ; U1.T1 3504,2813.56 3504,3344.55 U1.A1 ; C14.2 3769.5,2486.5 3868,2388 3880,2388 ; U1.L6 3730.63,2981.26 3769.37,3020 U1.K7 ; U1.F6 3730.63,3176.85 3769.37,3138.11 U1.G7 ; U1.G10 3888.11,3138.22 3927.37,3177.48 U1.F11 ; R_STEP.2 4244,1285.55 4244.55,1286.11 ; C12.1 3991,2420 3959,2388 3880,2388 ; U1.T16 4158.11,2750 4226,2750 4276,2800 4276,2943.85 ; U1.A16 4276,3222.66 4276,3020 4346.15,2949.85 ; C11.2 4342.99,2428 4342.99,2162.01 4402,2103 ; Y1.2 4450,2999.85 4400,2949.85 4346.15,2949.85 ; R_RESET.2 4244.55,1286.11 ; v1(4526,2480) C10.2 4422,2480 4402,2460 4402,2103 ; v1(4684,2532) 4730,2486 C9.2 ; 1895,3230 2095.87,3230 2260.43,3230 ; 2002.43,3695 2075.43,3695 ; 2075.43,3695 2250,3695 2265,3710 D3.2 2265,3790 2296,3821 2296,4850 2348,4902 2936.17,4902 C1.2 2938.17,4754.83 3016,4677 3016,4566 3030,4552 ; 3000,4552 3030,4552 ; 3030,4552 3190,4552 ; C5.2@3173.17,4589.35 3210.51,4552 ; C5.2@3173.17,4589.35 3173.17,4568.83 3190,4552 ; 3190,4552 3210.51,4552 ; 3210.51,4552 3358.5,4552 ; 3880,2388 3868,2400 3868,2465.5 3887.5,2485 C13.2 3915,2589 3960,2634 4450,2634 4496,2680 4496,2800 4346.15,2949.85 ; 4244.55,1286.11 4500,1541.55 4500,2005 4402,2103
  Top Layer w20: D12.2 1721,2380 1756,2415 1756,2600 1834,2678 1900,2678 1925,2653 1925,2467.57 1895.43,2438 D13.2 ; D0.2 1742,3786.57 1834.3,3786.57 D1.2 ; D8.2 1695.87,2767 1727,2767 1759,2735 1887.5,2735 ; D9.2 1925,2780 1944,2799 1944,3140 1962,3158 2050,3158 2101,3107 2101,2801.43 2080.43,2780.87 D10.2 2080.43,2747.57 2150,2678 2203.43,2678 2275.43,2750 D11.2 ; D6.2 2075.87,3250 2095.87,3230 ; D14.2 2085.43,2350 2115.43,2320 2263.37,2320 2280.87,2337.5 D15.2 ; C17.2 3215,2485 3218.5,2481.5 C16.2 C15.2 ; C5.2@3168.17,4610.17 C5.2 ; C6.2 C3.2 ; U1.T1 3533.78,2500.28 C15.2 ; C14.2 3622,2486.5 3617,2481.5 C15.2 ; U1.K7 U1.J7 ; U1.K8 U1.J8 ; U1.H8 U1.G8 ; U1.H9 U1.H10 U1.G10 U1.G9 U1.G8 ; U1.J10 U1.K10 U1.K9 U1.J9 U1.J8 ; C12.1 4334.99,2420 4342.99,2428 ; U1.A16 4151.42,3401.42 C_OSC.2 ; 4276,2943.85 4276,3020 ; R_RESET.2 4789,1286.11 4809.12,1306.22 R_RUN.2 ; R_TRST.2 5525,2700.35 5499.22,2726.14 5499.22,2946.22 5550,2997 6014.85,2997 JTAG1.9 ; JTAG1.3 JTAG1.5 6132,2817.63 6132,2879.85 JTAG1.9 ; R_TCK.2 6284.77,2915.71 6273,2927.48 JTAG1.9 ; U1.J7 U1.H7 U1.G7 U1.G8 ; U1.J7 U1.J8
  Bottom Layer w10: v1(4526,2480) 6063,2480 6100,2517 ; v1(4684,2532) 4699,2517 6100,2517 ; JTAG1.3 6132,2643.63 6132,2549 6100,2517
  other v2: 2471.69,4376.69 2515,4376.69 2558.31,4376.69 2471.69,4420 2515,4420 2558.31,4420 2471.69,4463.31 2515,4463.31 2558.31,4463.31
JTAG_TCK: JTAG1.4 R_TCK.1 U1.P13 | length 2656
  Top Layer w20: JTAG1.4 5958,2643.63 5958,1863 6142,1679 6475,1679 6546,1750 6546,2651 6475,2722 R_TCK.1
JTAG_TDI: JTAG1.8 R_TDI.1 U1.R14 | length 445.4
  Top Layer w20: R_TDI.1 5969.92,2884.45 JTAG1.8
JTAG_TDO: JTAG1.6 U1.R16 | length 1903.3
  Top Layer w20: U1.R16 v1(4223.15,2823.15)
  Bottom Layer w20: v1(4223.15,2823.15) 4485.85,2823.15 4539,2770 JTAG1.6
JTAG_TMS: JTAG1.2 R_TMS.1 U1.T15 | length 2535.5
  Top Layer w10: U1.T15 4160.74,2708 4391,2708 v1(4451,2768) ; JTAG1.2 6053.15,2565 6263.55,2565 6288,2589.45 R_TMS.1
  Bottom Layer w10: v1(4451,2768) 4606.48,2612.52 JTAG1.2
JTAG_TRST: JTAG1.10 R_TRST.1 U1.P15 | length 914.3
  Top Layer w20: v1(5436,2817) 5436,2683.65 5500,2619.65 R_TRST.1
  Bottom Layer w20: v1(5436,2817) 5546.48,2927.48 JTAG1.10
LED0: R0.1 U1.C5
LED1: R1.1 U1.C6
LED2: R2.1 U1.D4
LED3: R3.1 U1.C4
LED4: R4.1 U1.D6
LED5: R5.1 U1.A5 | length 2264.2
  Top Layer w10: R5.1 1806.5,3550 v1(1895.5,3639) ; v1(3670,3664) 3670,3395.59 U1.A5
  Bottom Layer w10: v1(1895.5,3639) 3645,3639 v1(3670,3664)
LED6: R6.1 U1.B5
LED7: R7.1 U1.B6
LED8: R8.1 U1.A6 | length 2671.3
  Top Layer w10: R8.1 v1(1615,3110) ; U1.A6 3706.05,3398.91 3706.05,3585.05 v1(3737,3616)
  Bottom Layer w10: v1(1615,3110) 2121,3616 v1(3737,3616)
LED9: R9.1 U1.A7 | length 2313.7
  Top Layer w20: R9.1 v1(1811.5,3115) ; U1.A7 v1(3770,3493)
  Bottom Layer w20: v1(1811.5,3115) 2144.94,3448.44 3725.44,3448.44 v1(3770,3493)
LED10: R10.1 U1.D7
LED11: R11.1 U1.C7
LED12: R12.1 U1.B7
LED13: R13.1 U1.C8
LED14: R14.1 U1.E8
LED15: R15.1 U1.D8
NetC2_1: C2.1 C3.1 U2.3 | length 1593.1
  Top Layer w20: 2385.28,4571.72 U2.3 ; C2.1 3061.83,4849.83 3140,4928 3250,4928 3318.5,4859.5 C3.1 3288.5,4800 3276,4812.5 v1(3276,4854)
  Bottom Layer w20: 2385.28,4571.72 2387,4570 2992,4570 v1(3276,4854)
NetD0_1: D0.1 R0.2 | length 244.4
  Top Layer w20: D0.1 1624.57,3820 1683.5,3878.93 R0.2
NetD1_1: D1.1 R1.2 | length 589.9
  Top Layer w10: D1.1 1810,3705 1800,3695 1678,3695 1663,3710 1663,3784 1754,3875 1858.5,3875 1883.5,3900 R1.2
NetD2_1: D2.1 R2.2 | length 246.5
  Top Layer w20: D2.1 2004.57,3813 2068.5,3876.93 R2.2
NetD3_1: D3.1 R3.2 | length 237.3
  Top Layer w10: D3.1 2194.13,3779.13 2260,3845 R3.2
NetD4_1: D4.1 R4.2 | length 244.4
  Top Layer w20: D4.1 1619.57,3350 1678.5,3408.93 R4.2
NetD5_1: D5.1 R5.2 | length 245.4
  Top Layer w20: D5.1 1824.13,3357 1873.5,3406.36 R5.2
NetD6_1: D6.1 R6.2 | length 237.8
  Top Layer w10: D6.1 2005,3330 2060,3385 R6.2
NetD7_1: D7.1 R7.2 | length 240.3
  Top Layer w20: D7.1 2209.57,3360 2258.5,3408.93 R7.2
NetD8_1: D8.1 R8.2 | length 278.6
  Top Layer w20: D8.1 1625,2879 1682,2936 R8.2
NetD9_1: D9.1 R9.2 | length 275.1
  Top Layer w20: D9.1 1830,2907 1878.5,2955.5 R9.2
NetD10_1: D10.1 R10.2 | length 283
  Top Layer w10: D10.1 2009.57,2854.57 2065,2910 R10.2
NetD11_1: D11.1 R11.2 | length 300.6
  Top Layer w20: D11.1 2278.5,2853.93 R11.2
NetD12_1: D12.1 R12.2 | length 210.7
  Top Layer w10: D12.1 1620,2425 1670,2475 R12.2
NetD13_1: D13.1 R13.2 | length 221.5
  Top Layer w20: D13.1 1824.57,2445 1888.5,2508.93 R13.2
NetD14_1: D14.1 R14.2 | length 226.5
  Top Layer w20: D14.1 2014.57,2443 2078.5,2506.93 R14.2
NetD15_1: D15.1 R15.2 | length 231.3
  Top Layer w20: D15.1 2210,2467 2273.5,2530.5 R15.2
NetDISP1_1: DISP1.1 R_SEG_E.2 | length 1093.5
  Top Layer w20: DISP1.1 2706.61,1457.39 2668,1496 2668,1850 2749.34,1931.34 R_SEG_E.2
NetDISP1_2: DISP1.2 R_SEG_D.2 | length 1134.6
  Top Layer w10: R_SEG_D.2 2544.84,1931.34 2526,1912.5 2526,1151 2571.69,1105.31 2750,1105.31 2763.31,1118.62 DISP1.2
NetDISP1_4: DISP1.4 R_SEG_C.2 | length 1678.9
  Top Layer w10: R_SEG_C.2 2287,1920 2327,1880 2327,1120 2385,1062 2826.19,1062 2876.69,1112.5 DISP1.4
NetDISP1_5: DISP1.5 R_DP.2 | length 2028.6
  Top Layer w10: DISP1.5 2933.39,1120 2995.39,1058 3277,1058 4232,2013 4400,2013 4424,1989 4424,1946.34 R_DP.2
NetDISP1_6: DISP1.6 R_SEG_B.2 | length 1940.4
  Top Layer w10: R_SEG_B.2 1960.68,1917.68 2013,1970 3074,1970 3084,1960 3084,1778 2933.39,1627.39 DISP1.6
NetDISP1_7: DISP1.7 R_SEG_A.2 | length 1930
  Top Layer w20: R_SEG_A.2 1156,1916.34 1156,1898 v1(1397,1657) ; DISP1.7 v1(2876.69,1657)
  Bottom Layer w20: v1(1397,1657) v1(2876.69,1657)
NetDISP1_9: DISP1.9 R_SEG_F.2 | length 983.5
  Top Layer w20: DISP1.9 2763.31,1723.31 v1(2908,1868) ; v1(3231,1868) 3304.34,1941.34 R_SEG_F.2
  Bottom Layer w20: v1(2908,1868) v1(3231,1868)
NetDISP1_10: DISP1.10 R_SEG_G.2 | length 1519.1
  Top Layer w20: DISP1.10 2706.61,1760.61 v1(2720,1774) ; v1(3752.66,1774) 3925,1946.34 R_SEG_G.2
  Bottom Layer w20: v1(2720,1774) v1(3752.66,1774)
OSC_CLK: U1.A2 Y1.3 | length 1649.8
  Top Layer w10: U1.A2 3548,3399.48 3548,3632 3625,3709 4317,3709 4450,3576 Y1.3
RESET: BTN_RESET.3 BTN_RESET.4 R_RESET.1 U1.A3 | length 4520.7
  Top Layer w10: v1(3593,3494) 3593,3393.85 U1.A3
  Top Layer w20: R_RESET.1 v1(4698,1225) ; BTN_RESET.4 BTN_RESET.3
  Bottom Layer w10: v1(3593,3494) 3670,3494 3714,3538 4050,3538 4130.15,3457.85 4130.15,2695 4857.2,1967.95 BTN_RESET.3
  Bottom Layer w20: v1(4698,1225) 5185.05,1712.05 BTN_RESET.4
RUN_SW: R_RUN.1 SW_RUN.2 U1.B4 | length 1584.3
  Top Layer w20: R_RUN.1 5139,1203.78 v1(5205,1269.78)
  Bottom Layer w20: v1(5205,1269.78) 5981.67,1269.78 SW_RUN.2
SEG_A: R_SEG_A.1 U1.B8
SEG_B: R_SEG_B.1 U1.A8 | length 2993
  Top Layer w20: R_SEG_B.1 1852,1835 v1(1968,1719) ; U1.A8 3809.37,3423.74
  Bottom Layer w20: v1(1968,1719) 3504,3255 3640.63,3255 3809.37,3423.74
SEG_C: R_SEG_C.1 U1.D9
SEG_D: R_SEG_D.1 U1.E9
SEG_E: R_SEG_E.1 U1.B9
SEG_F: R_SEG_F.1 U1.C9
SEG_G: R_SEG_G.1 U1.A9 | length 1769.6
  Top Layer w10: U1.A9 3848.74,3424.74 v1(3876,3452) ; R_SEG_G.1 3987.5,1863.66 4010,1886.16 v1(4010,2330)
  Bottom Layer w10: v1(3876,3452) 4010,3318 v1(4010,2330)
STEP_BTN: BTN_STEP.3 BTN_STEP.4 R_STEP.1 U1.A4 | length 5939.1
  Top Layer w10: R_STEP.1 4059.45,1135 5389.37,1135 BTN_STEP.4
  Top Layer w20: v1(3625,3546) 3642.52,3528.48 3642.52,3383.7 U1.A4 ; v1(5010,3568) 5010,1658.47 BTN_STEP.4 BTN_STEP.3
  Bottom Layer w20: v1(3625,3546) 3647,3568 v1(5010,3568)
pads on no net: J1.3 JTAG1.7 SW1.3 SW_RUN.3 U1.A11 U1.A12 U1.A13 U1.A14 U1.A15 U1.B1 U1.B2 U1.B10 U1.B11 U1.B12 U1.B13 U1.B14 U1.B15 U1.B16 U1.C1 U1.C2 U1.C10 U1.C11 U1.C12 U1.C13 U1.C15 U1.C16 U1.D1 U1.D2 U1.D3 U1.D10 U1.D11 U1.D13 U1.D14 U1.D15 U1.D16 U1.E1 U1.E2 U1.E3 U1.E4 U1.E13 U1.E14 U1.E15 U1.E16 U1.F1 U1.F2 U1.F3 U1.F4 U1.F13 U1.F14 U1.F15 U1.F16 U1.G1 U1.G2 U1.G3 U1.G4 U1.G13 U1.G14 U1.G15 U1.G16 U1.H1 U1.H2 U1.H3 U1.H5 U1.H12 U1.H13 U1.H14 U1.H15 U1.H16 U1.J1 U1.J2 U1.J4 U1.J5 U1.J12 U1.J13 U1.J14 U1.J15 U1.J16 U1.K1 U1.K2 U1.K3 U1.K4 U1.K13 U1.K14 U1.K15 U1.K16 U1.L1 U1.L2 U1.L3 U1.L4 U1.L13 U1.L14 U1.L15 U1.L16 U1.M1 U1.M2 U1.M3 U1.M4 U1.M8 U1.M9 U1.M13 U1.M14 U1.M15 U1.M16 U1.N1 U1.N2 U1.N3 U1.N4 U1.N6 U1.N7 U1.N8 U1.N9 U1.N10 U1.N11 U1.N13 U1.N15 U1.N16 U1.P1 U1.P2 U1.P4 U1.P5 U1.P6 U1.P7 U1.P8 U1.P9 U1.P10 U1.P11 U1.P16 U1.R1 U1.R2 U1.R3 U1.R4 U1.R5 U1.R6 U1.R7 U1.R8 U1.R9 U1.R10 U1.R11 U1.R12 U1.R13 U1.T2 U1.T3 U1.T4 U1.T5 U1.T6 U1.T7 U1.T8 U1.T9 U1.T10 U1.T11 U1.T12 U1.T13 U1.T14 U3.2 U3.11 U3.15

## Polygon pours and split planes (outlines as drawn)
GND on Top Layer "NONET_L01_P005" (solid, shelved, pour order 5): 1010,4990 6995,4990 7000,4985 7000,1010 1000,1010
GND on Bottom Layer "NONET_L02_P006" (solid, shelved, pour order 6): 1005,4985 1025,5005 7000,5005 7000,995 6985,1010 1000,1010